# Altium PCB ArmBand-Control-Board.PcbDoc (part 2 of 3)
Units mil, origin at the board's own origin, x right, y up, seen from the top; angles counter-clockwise.
Board outline 1771.65 x 1771.65 mil, 2 copper layers (Top Layer, Bottom Layer), stack 34 mil thick; 107 components, 81 nets, 408 pads, 170 vias.
Unrouted connection lines stored in the file: 5.
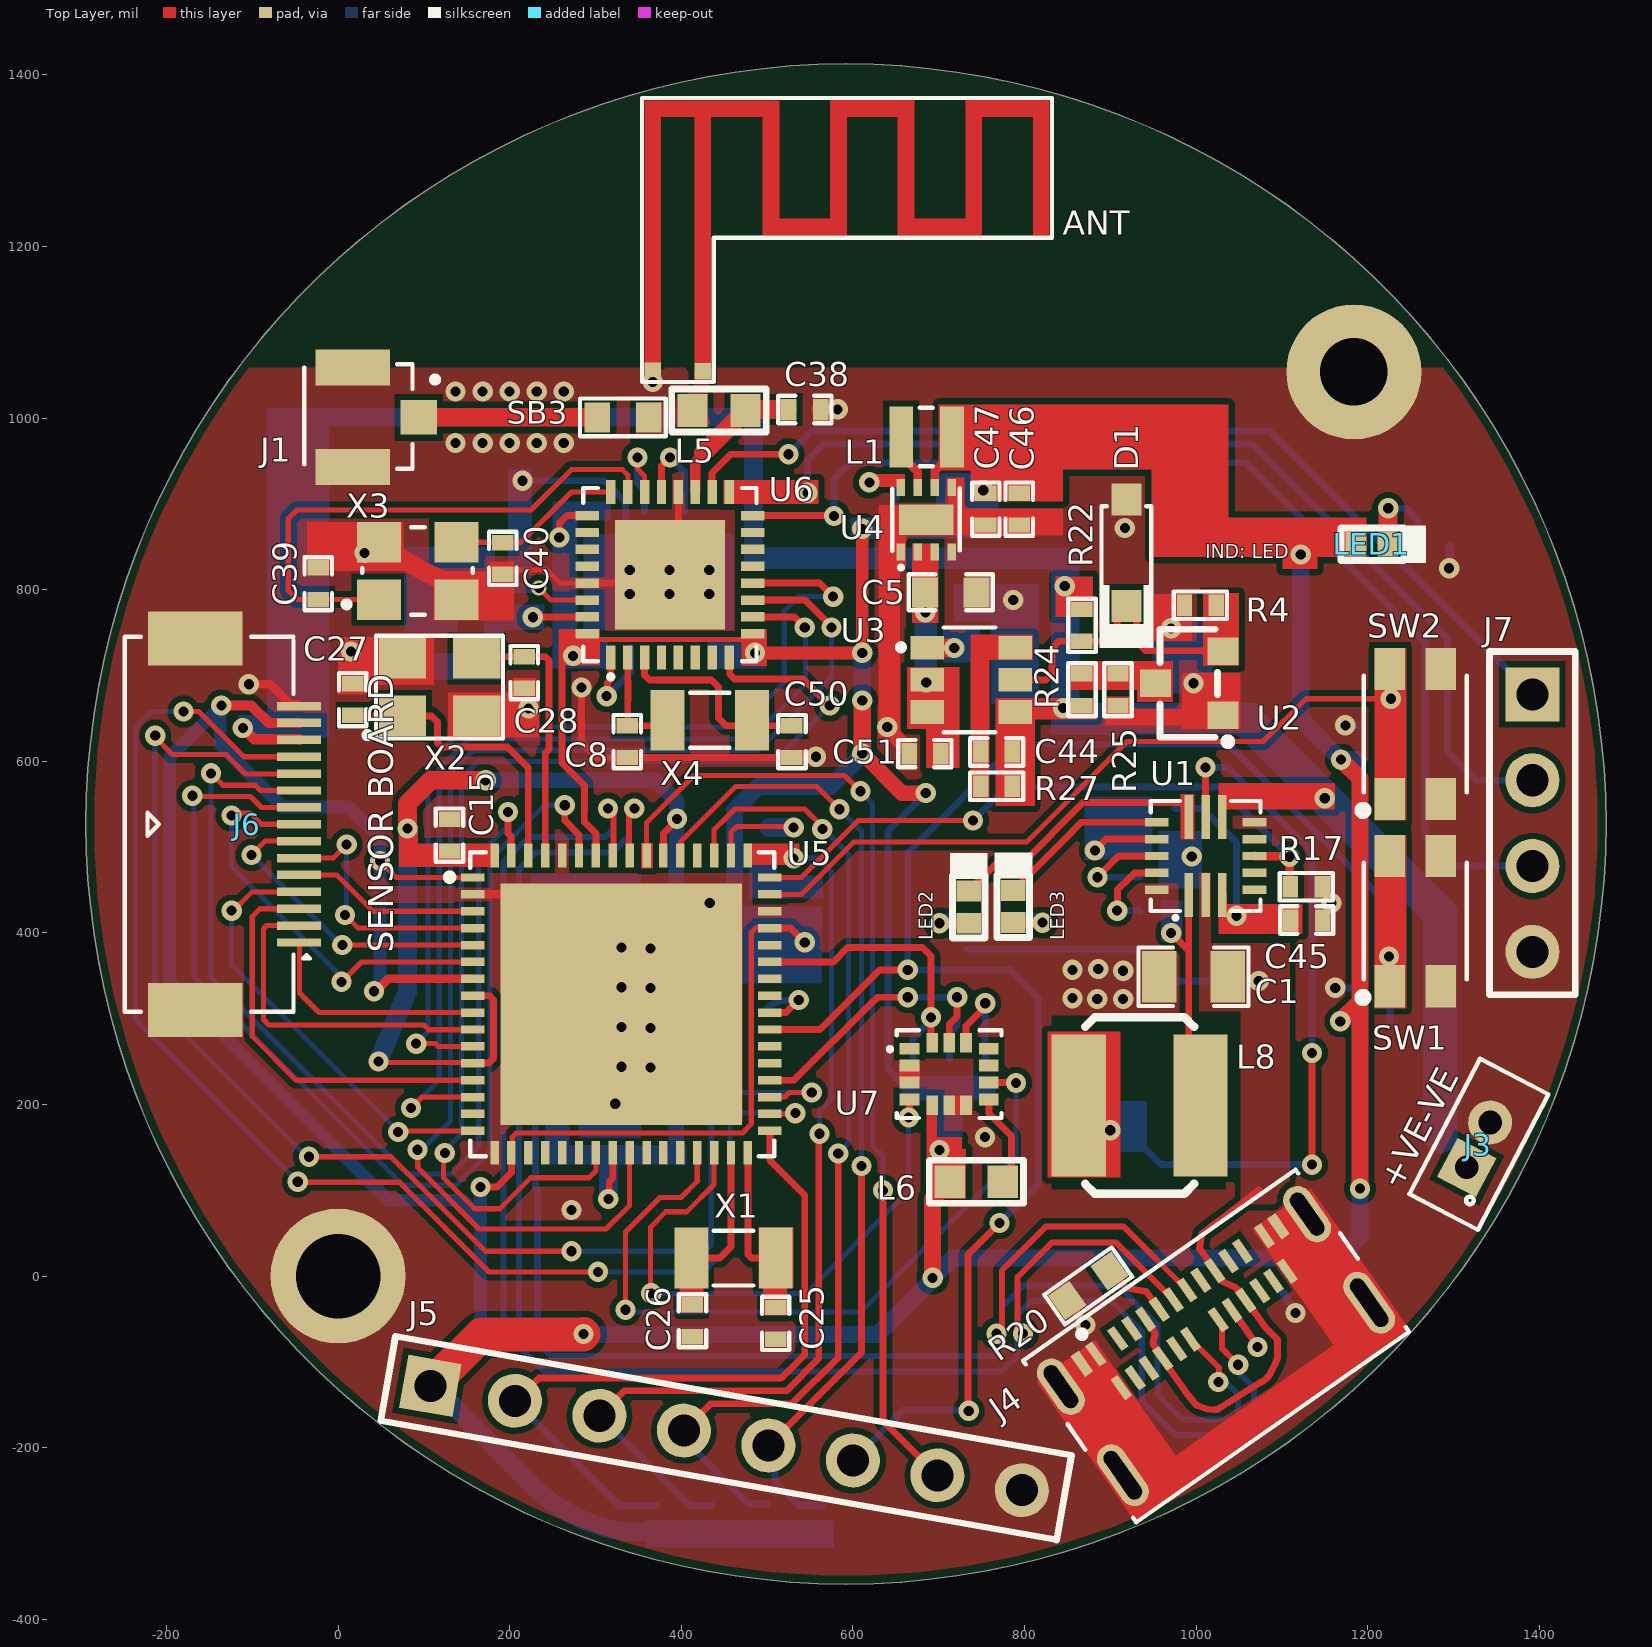
[diagram p0: Top Layer view]

## Part data (continued)
R2 R3 R9 R28: library part RC0402JR-071KL, "RES 1K OHM 5% 1/16W 0402", Case Code (Imperial)=0402, Case Code (Metric)=1005, Manufacturer=Yageo, Max Operating Temperature=155°C, Max Power Dissipation=63mW, Min Operating Temperature=-55°C, Package Quantity=1, Power Rating=62.5mW, Resistance=1kR, Resistance Tolerance=5%, Resistor Type="Thick Film", Supplier Part Number 1=311-1.0KJRCT-ND, Temperature Coefficient=100ppm/°C, Voltage Rating=50V, Case/Package=0402, Category="Chip SMD Resistors", ComponentLink1Description=https://datasheet.ciiva.com/7983/1018594-7983558.pdf?src-supplier=Element14, ComponentLink1URL=https://datasheet.ciiva.com/7983/1018594-7983558.pdf?src-supplier=Element14, ComponentLink2Description=https://datasheet.ciiva.com/2452/pyu-r-int-thick-7-2452756.pdf?src-supplier=Digi-Key, ComponentLink2URL=https://datasheet.ciiva.com/2452/pyu-r-int-thick-7-2452756.pdf?src-supplier=Digi-Key, ComponentLink3Description=https://datasheet.ciiva.com/2452/pyu-r-int-thick-7-2452757.pdf?src-supplier=Digi-Key, ComponentLink3URL=https://datasheet.ciiva.com/2452/pyu-r-int-thick-7-2452757.pdf?src-supplier=Digi-Key, ComponentLink4Description=https://datasheet.ciiva.com/2452/pyu-r-int-thick-7-2452755.pdf?src-supplier=Digi-Key, ComponentLink4URL=https://datasheet.ciiva.com/2452/pyu-r-int-thick-7-2452755.pdf?src-supplier=Digi-Key, ComponentLink5Description=https://datasheet.ciiva.com/7850/1018594-7850170.pdf?src-supplier=Element14, ComponentLink5URL=https://datasheet.ciiva.com/7850/1018594-7850170.pdf?src-supplier=Element14, ComponentLink6Description=https://datasheet.ciiva.com/7850/1018594-7850171.pdf?src-supplier=Element14, ComponentLink6URL=https://datasheet.ciiva.com/7850/1018594-7850171.pdf?src-supplier=Element14, ComponentLink7Description=https://datasheet.ciiva.com/17081/pyu-rc0402-51-rohs-l-6-r-17081438.pdf?src-supplier=Future+Electronics, ComponentLink7URL=https://datasheet.ciiva.com/17081/pyu-rc0402-51-rohs-l-6-r-17081438.pdf?src-supplier=Future+Electronics, Construction=Rectangular, Depth=0.5mm, Features="Moisture Resistant", Height=0.016inch, Lead Free="Lead Free", Length=0.039inch, Manufacturer Part Number=RC0402JR-071KL, Military Standard=Not, Number of Terminations=2, Packaging="Tape and Reel", Pricing 1="1=0.10000, 10=0.01300, 100=0.00540, 1000=0.00244, 2500=0.00212, 5000=0.00175 (USD)", REACH SVHC="No SVHC", RoHS=Yes, RoHS Compliant=Yes, Series=RC, Size Code=0402, Stock 1=452315, Supplier 1=Digi-Key, Termination=SMD/SMT, Tolerance=5%, Width=0.02inch
R4 R5 R6 R12 R18 R19 R25 R27: library part RC0402FR-0710KL, "RES SMD 10K OHM 1% 1/16W 0402", Case Code (Imperial)=0402, Case Code (Metric)=1005, Manufacturer=Yageo, Max Operating Temperature=155°C, Min Operating Temperature=-55°C, Power Rating=62.5mW, Resistance=10kR, Supplier Part Number 1=311-10.0KLRDKR-ND, Temperature Coefficient=100ppm/°C, Tolerance=1%, Voltage Rating=50V, Case/Package=0402, ComponentLink1Description=http://www.farnell.com/datasheets/2167052.pdf?src-supplier=Element14, ComponentLink1URL=http://www.farnell.com/datasheets/2167052.pdf?src-supplier=Element14, ComponentLink2Description=http://www.farnell.com/datasheets/1686128.pdf?src-supplier=Element14, ComponentLink2URL=http://www.farnell.com/datasheets/1686128.pdf?src-supplier=Element14, ComponentLink3Description=http://www.farnell.com/datasheets/1784430.pdf?src-supplier=Element14, ComponentLink3URL=http://www.farnell.com/datasheets/1784430.pdf?src-supplier=Element14, ComponentLink4Description=http://www.yageo.com/documents/recent/PYu-RC_Group_51_RoHS_L_9.pdf?src-supplier=Mouser, ComponentLink4URL=http://www.yageo.com/documents/recent/PYu-RC_Group_51_RoHS_L_9.pdf?src-supplier=Mouser, Composition="Thick Film", Depth=0.5mm, Height=0.32mm, Lead Free="Lead Free", Lead Pitch=0.2mm, Length=1mm, Manufacturer Part Number=RC0402FR-0710KL, Military Standard=Not, Number of Pins=2, Number of Terminations=2, Packaging="Tape and Reel", Pricing 1="1=0.1, 10=0.016, 100=0.0064, 1000=0.00289, 2500=0.00251, 5000=0.00207 (USD)", REACH SVHC="No SVHC", Stock 1=60122563, Supplier 1=Digi-Key, Termination=SMD/SMT, Voltage Rating (DC)=50V, Width=0.5mm, Working Voltage=50V
R7 R8 R13 R14 R15 R16 R17 R26: library part ERJPA2F1003X, "RES SMD 100K OHM 1% 1/5W 0402", Case Code (Imperial)=0402, Case Code (Metric)=1005, Manufacturer=Panasonic, Manufacturer Part Number=ERJ-PA2F1003X, Max Operating Temperature=155°C, Max Power Dissipation=200mW, Min Operating Temperature=-55°C, Resistance=100kR, Supplier Part Number 1=P17236CT-ND, Temperature Coefficient=100ppm/°C, Tolerance=1%, Voltage Rating=50V, Case/Package=0402, ComponentLink1Description=http://www.farnell.com/datasheets/2051174.pdf?src-supplier=Element14, ComponentLink1URL=http://www.farnell.com/datasheets/2051174.pdf?src-supplier=Element14, ComponentLink2Description=https://industrial.panasonic.com/ww/system/files/data/download/catalog/id_fixed-resistors_e_1.pdf?src-supplier=Digi-Key, ComponentLink2URL=https://industrial.panasonic.com/ww/system/files/data/download/catalog/id_fixed-resistors_e_1.pdf?src-supplier=Digi-Key, Composition="Thick Film", Features="Automotive AEC-Q200", Height=0.016inch, Length=0.039inch, Number of Terminations=2, Packaging="Cut Tape", Power Rating=200mW, Pricing 1="1=0.21, 10=0.175, 100=0.0686, 1000=0.02871, 2500=0.02632, 5000=0.02393 (USD)", REACH SVHC=Unknown, Stock 1=8829, Supplier 1=Digi-Key, Voltage Rating (DC)=50V, Width=0.02inch
R10 R11: library part ERJ2GEJ472X, "RES SMD 4.7K OHM 5% 1/10W 0402", Case Code (Imperial)=0402, Case Code (Metric)=1005, Manufacturer=Panasonic, Manufacturer Part Number=ERJ-2GEJ472X, Max Operating Temperature=155°C, Max Power Dissipation=100mW, Min Operating Temperature=-55°C, Package Quantity=1, Resistance=4.7kR, Resistance Tolerance=5%, Resistor Type="Thick Film", Temperature Coefficient=200ppm/°C, Voltage Rating=50V, Case/Package=0402, Category="Chip SMD Resistors", ComponentLink1Description=https://datasheet.ciiva.com/11821/0900766b80f806dd-11821328.pdf?src-supplier=RSComponents, ComponentLink1URL=https://datasheet.ciiva.com/11821/0900766b80f806dd-11821328.pdf?src-supplier=RSComponents, ComponentLink2Description=https://datasheet.ciiva.com/46377/1678796-46377565.pdf?src-supplier=Element14, ComponentLink2URL=https://datasheet.ciiva.com/46377/1678796-46377565.pdf?src-supplier=Element14, ComponentLink3Description=https://datasheet.ciiva.com/28514/1678796-28514168.pdf?src-supplier=Element14, ComponentLink3URL=https://datasheet.ciiva.com/28514/1678796-28514168.pdf?src-supplier=Element14, ComponentLink4Description=https://datasheet.ciiva.com/16758/70260739-16758341.pdf?src-supplier=Allied+Electronics, ComponentLink4URL=https://datasheet.ciiva.com/16758/70260739-16758341.pdf?src-supplier=Allied+Electronics, ComponentLink5Description=https://datasheet.ciiva.com/16770/70260739-16770309.pdf?src-supplier=Allied+Electronics, ComponentLink5URL=https://datasheet.ciiva.com/16770/70260739-16770309.pdf?src-supplier=Allied+Electronics, Construction=Rectangular, Contact Plating=Tin, Depth=0.5mm, Features="Automotive AEC-Q200", Height=0.35mm, Lead Free="Lead Free", Length=1mm, Military Standard=Not, Mount="Surface Mount", Number of Terminations=2, Packaging="Cut Tape", Power Rating=100mW, Pricing 1="10000=0.00340 (USD)", Radiation Hardening=No, REACH SVHC="No SVHC", RoHS=Yes, RoHS Compliant=Yes, Series=ERJ, Size Code=0402, Stock 1=1650000, Supplier 1="Arrow Electronics", Supplier Part Number 1=ERJ-2GEJ472X, Technology="THICK FILM", Termination=SMD/SMT, Tolerance=5%, Voltage Rating (DC)=50V, Width=0.5mm
R20 R21: library part RMCF0603FT5K10, "RES 5.1K OHM 1% 1/10W 0603", Case Code (Imperial)=0603, Case Code (Metric)=1608, Manufacturer="Stackpole Electronics", Max Operating Temperature=155°C, Max Power Dissipation=100mW, Min Operating Temperature=-55°C, Resistance=5.1kR, Resistor Type="Thick Film", Supplier Part Number 1=RMCF0603FT5K10DKR-ND, Temperature Coefficient=100ppm/°C, Tolerance=1%, Case/Package=0603, ComponentLink1Description=https://www.seielect.com/catalog/SEI-RMCF_RMCP.pdf?src-supplier=Avnet, ComponentLink1URL=https://www.seielect.com/catalog/SEI-RMCF_RMCP.pdf?src-supplier=Avnet, ComponentLink2Description=http://components.arrow.com/part/dataview/50863347S9465827N1174?src-supplier=Arrow+Electronics, ComponentLink2URL=http://components.arrow.com/part/dataview/50863347S9465827N1174?src-supplier=Arrow+Electronics, ComponentLink3Description=https://www.seielect.com/catalog/SEI-Packaging.pdf?src-supplier=Digi-Key, ComponentLink3URL=https://www.seielect.com/catalog/SEI-Packaging.pdf?src-supplier=Digi-Key, Contact Plating=Tin,Matte, Features="Automotive AEC-Q200", Height=0.022inch, Length=0.061inch, Manufacturer Part Number=RMCF0603FT5K10, Mount="Surface Mount", Number of Terminations=2, Packaging="Tape and Reel", Pricing 1="1=0.1, 10=0.017, 100=0.0068, 1000=0.00305, 2500=0.00264 (USD)", Radiation Hardening=No, RoHS Compliant=Yes, Series=RMCF, Stock 1=58341, Supplier 1=Digi-Key, Width=0.031inch
R22: library part RC0402FR-0710KL, "RES 10K OHM 1% 1/16W 0402", Case Code (Imperial)=0402, Case Code (Metric)=1005, LCSC Part Number=C60490, Manufacturer=Yageo, Max Operating Temperature=155°C, Max Power Dissipation=63mW, Min Operating Temperature=-55°C, Power Rating=62.5mW, Resistance=10kR, Resistance Tolerance=1%, Resistor Type="Thick Film", Supplier Part Number 1=603-RC0402FR-0710KL, Temperature Coefficient=100ppm/°C, Voltage Rating=50V, Case/Package=0402, Category="Chip SMD Resistors", ComponentLink1Description=https://datasheet.ciiva.com/7660/38568-7660787.pdf?src-supplier=Element14, ComponentLink1URL=https://datasheet.ciiva.com/7660/38568-7660787.pdf?src-supplier=Element14, ComponentLink2Description=https://datasheet.ciiva.com/7849/1686128-7849814.pdf?src-supplier=Element14, ComponentLink2URL=https://datasheet.ciiva.com/7849/1686128-7849814.pdf?src-supplier=Element14, ComponentLink3Description=https://datasheet.ciiva.com/7983/1018594-7983486.pdf?src-supplier=Element14, ComponentLink3URL=https://datasheet.ciiva.com/7983/1018594-7983486.pdf?src-supplier=Element14, ComponentLink4Description=https://datasheet.ciiva.com/22747/1018594-22747512.pdf?src-supplier=Element14, ComponentLink4URL=https://datasheet.ciiva.com/22747/1018594-22747512.pdf?src-supplier=Element14, ComponentLink5Description=https://datasheet.ciiva.com/12667/pyu-rc0402-51-rohs-l-6-r-12667067.pdf?src-supplier=Mouser, ComponentLink5URL=https://datasheet.ciiva.com/12667/pyu-rc0402-51-rohs-l-6-r-12667067.pdf?src-supplier=Mouser, ComponentLink6Description=https://datasheet.ciiva.com/7849/1784430-7849813.pdf?src-supplier=Element14, ComponentLink6URL=https://datasheet.ciiva.com/7849/1784430-7849813.pdf?src-supplier=Element14, ComponentLink7Description=https://datasheet.ciiva.com/7849/1784430-7849815.pdf?src-supplier=Element14, ComponentLink7URL=https://datasheet.ciiva.com/7849/1784430-7849815.pdf?src-supplier=Element14, Construction=Rectangular, Depth=0.5mm, Features="Moisture Resistant", Height=0.32mm, Item Type=Resistor, Lead Free="Lead Free", Lead Pitch=0.2mm, Length=1mm, Manufacturer Part Number=RC0402FR-0710KL, Military Standard=Not, Number of Pins=2, Number of Terminations=2, Packaging="Tape and Reel", Pricing 1="1=0.10000, 10=0.01400, 50=0.01400, 100=0.00500, 1000=0.00300, 10000=0.00200 (USD)", REACH SVHC="No SVHC", RoHS=Yes, RoHS Compliant=Yes, Series=RC, Stock 1=18648329, Supplier 1=Mouser, Termination=SMD/SMT, Tolerance=1%, Voltage Rating (DC)=50V, Width=0.5mm, Working Voltage=50V
R24: library part AC0402DR-0710K7L, "RES SMD 0402 10.7kOhm 0.5% Paper T/R", Manufacturer=Yageo, Category="Chip SMD Resistors", Manufacturer Part Number=AC0402DR-0710K7L, Pricing 1="10000=0.00820 (USD)", RoHS=Yes, RoHS Compliant=Yes, Supplier 1=Avnet, Supplier Part Number 1=AC0402DR-0710K7L
SB1 SB2 SB3: "Solder Bridge ON"
SW1 SW2: "3mm 2mm Round Button 50mA Top3.65mm SPST 12V SMD Tactile Switches", Manufacturer=XKB, ComponentLink1Description=LCSC, ComponentLink1URL=https://lcsc.com/product-detail/Tactile-Switches_XKB-Connectivity-TS-1185EC-C-D-B_C318893.html, Manufacturer Part Number=TS-1185EC-C-D-B
U1: "2.1A, 1- OR 2-CELL LI-ION BATTER", Manufacturer="Monolithic Power Systems", Supplier Part Number 1=1589-MP2615CGQ-ZCT-ND, Category=Uncategorized, Manufacturer Part Number=MP2615CGQ-Z, Pricing 1="1=2.38000, 10=2.13500, 25=2.01400, 100=1.71590, 250=1.61120, 500=1.40980, 1000=1.16812, 2500=1.14000 (USD)", RoHS=No, Stock 1=5000, Supplier 1=Digi-Key
U2: library part MAX809SEUR+T, "IC MPU/RESET CIRC SOT23-3", Case/Package=SOT-23, Manufacturer=Maxim, Max Operating Temperature=105°C, Max Output Current=20mA, Max Power Dissipation=320mW, Max Reset Threshold Voltage=2.96V, Max Supply Voltage=5.5V, Min Operating Temperature=-40°C, Min Reset Threshold Voltage=2.89V, Min Supply Voltage=1.2V, Nominal Supply Current=17uA, Number of Voltages Monitored=1, Operating Supply Current=60uA, Supplier Part Number 1=700-MAX809SEURT, Threshold Voltage=2.93V, Category="Voltage Supervisors", ComponentLink1Description=https://datasheet.ciiva.com/1169/max803-max810z-1169879.pdf?src-supplier=Element14, ComponentLink1URL=https://datasheet.ciiva.com/1169/max803-max810z-1169879.pdf?src-supplier=Element14, ComponentLink2Description=https://datasheet.ciiva.com/1169/max803-max810z-1169878.pdf?src-supplier=Element14, ComponentLink2URL=https://datasheet.ciiva.com/1169/max803-max810z-1169878.pdf?src-supplier=Element14, ComponentLink3Description=https://datasheet.ciiva.com/14226/max803-max810z-14226330.pdf?src-supplier=Avnet, ComponentLink3URL=https://datasheet.ciiva.com/14226/max803-max810z-14226330.pdf?src-supplier=Avnet, ComponentLink4Description=https://datasheet.ciiva.com/1973/max803-max810z-1973322.pdf?src-supplier=Digi-Key, ComponentLink4URL=https://datasheet.ciiva.com/1973/max803-max810z-1973322.pdf?src-supplier=Digi-Key, ComponentLink5Description=https://datasheet.ciiva.com/1973/max803-max810z-1973323.pdf?src-supplier=Digi-Key, ComponentLink5URL=https://datasheet.ciiva.com/1973/max803-max810z-1973323.pdf?src-supplier=Digi-Key, ComponentLink6Description=https://datasheet.ciiva.com/1973/max803-max810z-1973321.pdf?src-supplier=Digi-Key, ComponentLink6URL=https://datasheet.ciiva.com/1973/max803-max810z-1973321.pdf?src-supplier=Digi-Key, Height=0.94mm, Lead Free="Lead Free", Length=2.92mm, Manufacturer Part Number=MAX809SEUR+T, Mount="Surface Mount", Number of Pins=3, Output=TOTEM-POLE, Output Type=PUSH-PULL, Overvoltage Threshold=2.96V, Package Quantity=1, Packaging="Cut Tape", Power Dissipation=320mW, Pricing 1="1=3.68000, 10=3.31000, 25=3.13000, 50=3.13000, 100=2.72000, 250=2.58000, 500=2.31000, 1000=2.09000, 10000=2.01000 (USD)", Radiation Hardening=No, REACH SVHC="No SVHC", Reset="Active Low", Reset Timeout=140ms, RoHS=Yes, RoHS Compliant=Yes, Series=-, Stock 1=26180, Supplier 1=Mouser, Termination=SMD/SMT, Type="Simple Reset/Power-On Reset", Undervoltage Threshold=2.89V, Watchdog Timer=No, Width=1.3mm
U3: "IC PWR SWITCH P-CH 1:1 SUPERSOT6", Case/Package=SOT-23-6, Continuous Drain Current (ID)=2.3A, Drain to Source Voltage (Vdss)=20V, Manufacturer="ON Semiconductor / Fairchild", Max Operating Temperature=150°C, Max Power Dissipation=700mW, Min Input Voltage=3V, Min Operating Temperature=-55°C, On-State Resistance=80mR, Output Current=1.6A, Package Quantity=3000, Supplier Part Number 1=58K8823, Category="Hot Swap Controllers", ComponentLink1Description=https://datasheet.ciiva.com/34302/1222713-34302120.pdf?src-supplier=Jameco, ComponentLink1URL=https://datasheet.ciiva.com/34302/1222713-34302120.pdf?src-supplier=Jameco, ComponentLink2Description=https://datasheet.ciiva.com/4898/fdc6330l-102811-4898611.pdf?src-supplier=Mouser, ComponentLink2URL=https://datasheet.ciiva.com/4898/fdc6330l-102811-4898611.pdf?src-supplier=Mouser, ComponentLink3Description=https://datasheet.ciiva.com/1171/fdc6330l-1171185.pdf?src-supplier=Newark, ComponentLink3URL=https://datasheet.ciiva.com/1171/fdc6330l-1171185.pdf?src-supplier=Newark, ComponentLink4Description=https://datasheet.ciiva.com/1572/276121-1572006.pdf?src-supplier=Farnell, ComponentLink4URL=https://datasheet.ciiva.com/1572/276121-1572006.pdf?src-supplier=Farnell, ComponentLink5Description=https://datasheet.ciiva.com/28483/276121-28483263.pdf?src-supplier=Element14, ComponentLink5URL=https://datasheet.ciiva.com/28483/276121-28483263.pdf?src-supplier=Element14, ComponentLink6Description=https://datasheet.ciiva.com/1512/276121-1512459.pdf?src-supplier=Element14, ComponentLink6URL=https://datasheet.ciiva.com/1512/276121-1512459.pdf?src-supplier=Element14, ComponentLink7Description=https://datasheet.ciiva.com/3232/fdc6330l-3232841.pdf?src-supplier=Avnet, ComponentLink7URL=https://datasheet.ciiva.com/3232/fdc6330l-3232841.pdf?src-supplier=Avnet, ComponentLink8Description=https://datasheet.ciiva.com/17090/fdc6330l-17090428.pdf?src-supplier=Future+Electronics, ComponentLink8URL=https://datasheet.ciiva.com/17090/fdc6330l-17090428.pdf?src-supplier=Future+Electronics, ComponentLink9Description=https://datasheet.ciiva.com/3232/fdc6330l-3232552.pdf?src-supplier=Avnet, ComponentLink9URL=https://datasheet.ciiva.com/3232/fdc6330l-3232552.pdf?src-supplier=Avnet, ComponentLink10Description=https://datasheet.ciiva.com/1962/fdc6330l-1962053.pdf?src-supplier=Digi-Key, ComponentLink10URL=https://datasheet.ciiva.com/1962/fdc6330l-1962053.pdf?src-supplier=Digi-Key, ComponentLink11Description=https://datasheet.ciiva.com/1962/fdc6330l-1962054.pdf?src-supplier=Digi-Key, ComponentLink11URL=https://datasheet.ciiva.com/1962/fdc6330l-1962054.pdf?src-supplier=Digi-Key, ComponentLink12Description=https://datasheet.ciiva.com/1962/fdc6330l-1962052.pdf?src-supplier=Digi-Key, ComponentLink12URL=https://datasheet.ciiva.com/1962/fdc6330l-1962052.pdf?src-supplier=Digi-Key, Current=2.3A, Current Rating=2.3A, Height=1mm, Interface=On/Off, Lead Free="Lead Free", Length=3mm, Manufacturer Part Number=FDC6330L, Max Input Voltage=20V, Max Output Current=2.3A, Max Supply Voltage=20V, Min Supply Voltage=3V, Mount="Surface Mount", Number of Outputs=1, Number of Pins=6, Operating Supply Voltage=20V, Output Configuration="High Side", Packaging="Tape and Reel", Power Dissipation=700mW, Power Rating=700mW, Pricing 1="1=0.70000, 25=0.57700, 50=0.52400, 100=0.47100, 250=0.43700, 500=0.37200, 1000=0.30700 (USD)", Radiation Hardening=No, REACH SVHC="No SVHC", RoHS=Yes, RoHS Compliant=Yes, Supplier 1=Newark, Voltage=20V, Voltage Rating (DC)=20V, Weight=0.036g, Width=1.7mm
U4: "Buck Switching Regulator IC Positive Fixed 3.3V 1 Output 1A 8-WFDFN Exposed Pad", Case/Package=SOIC, Manufacturer="Texas Instruments", Max Input Voltage=17V, Max Operating Temperature=125°C, Max Output Current=1A, Max Output Voltage=3.3V, Min Input Voltage=3V, Min Operating Temperature=-40°C, Package Quantity=3000, Quiescent Current=17uA, Supplier Part Number 1=595-TPS62162DSGR, Switching Frequency=2.25MHz, Category="Voltage Regulators - Switching", ComponentLink1Description=https://datasheet.ciiva.com/2034/tps62161-2034675.pdf?src-supplier=Digi-Key, ComponentLink1URL=https://datasheet.ciiva.com/2034/tps62161-2034675.pdf?src-supplier=Digi-Key, Contact Plating=Gold, Lead Free="Lead Free", Manufacturer Part Number=TPS62162DSGR, Min Output Voltage=3.3V, Number of Outputs=1, Number of Pins=8, Operating Supply Voltage=17V, Output Configuration=Positive, Output Current=1A, Output Type=Fixed, Output Voltage=3.3V, Packaging="Tape and Reel", Pricing 1="1=1.59000, 10=1.44000, 25=1.36000, 50=1.36000, 100=1.16000, 250=1.09000, 500=0.94700, 1000=0.78500, 10000=0.78400 (USD)", Radiation Hardening=No, RoHS=Yes, RoHS Compliant=Yes, Series=DCS-Control™, Supplier 1=Mouser, Synchronous Rectifier=Yes
U5: "IC MCU 32BIT 512KB FLASH 64QFN", Case/Package=QFN, Frequency=120MHz, Manufacturer=Microchip, Max Operating Temperature=85°C, Min Operating Temperature=-40°C, Supplier Part Number 1=ATSAM4S8BA-MU-ND, Category=Microcontrollers, ComponentLink1Description=http://www.microchip.com/mymicrochip/filehandler.aspx?ddocname=en590343&src-supplier=Digi-Key, ComponentLink1URL=http://www.microchip.com/mymicrochip/filehandler.aspx?ddocname=en590343&src-supplier=Digi-Key, Core Architecture=ARM, Interface=I2C,SPI,USB,IrDA,UART,USART, Manufacturer Part Number=ATSAM4S8BA-MU, Memory Size=512KB, Memory Type=FLASH, Number of I/Os=47, Oscillator Type=Internal, Packaging=Tray, Peripherals="Brown-out Detect/Reset,POR,PWM,WDT,DMA", Pricing 1="1=6.23000, 25=5.66960, 100=5.13000 (USD)", RoHS=Yes, RoHS Compliant=Yes, Supplier 1=Digi-Key
U6: "IC RF TXRX+MCU BLUETOOTH 32WFQFN", Manufacturer="Nordic Semiconductor", Supplier Part Number 1=1490-NRF52810-QCAA-RCT-ND, Category="RF Receivers, Transceivers", Manufacturer Part Number=NRF52810-QCAA-R, Pricing 1="1=3.54000, 10=3.16200, 25=2.84640, 100=2.59320, 250=2.34024, 500=2.09990, 1000=1.77100 (USD)", RoHS=Yes, RoHS Compliant=Yes, Stock 1=2906, Supplier 1=Digi-Key
U7: "iNEMO Inertial Module: 3D Accelerometer and 3D Gyroscope, 1.71V to 3.6V, -40°C to 85°C, VFLGA-14L, RoHS", Manufacturer=STMicroelectronics, Supplier Part Number 1=03AH2347, Category="Inertial Measurement Units (IMUs)", ComponentLink1Description=https://www.st.com/resource/en/datasheet/lsm6dsr.pdf?src-supplier=Digi-Key, ComponentLink1URL=https://www.st.com/resource/en/datasheet/lsm6dsr.pdf?src-supplier=Digi-Key, Manufacturer Part Number=LSM6DSRTR, RoHS=Yes, RoHS Compliant=Yes, Supplier 1=Newark
X1 X4: library part X321532768KGD2SI, "32.768kHz SMD Crystal Resonator 12.5pF ±20ppm -40℃~+85℃ SMD3215-2P Crystals ROHS", Manufacturer="Yangxing Tech", ComponentLink1Description=LCSC, ComponentLink1URL=https://www.lcsc.com/product-detail/Crystals_Yangxing-Tech-X321532768KGD2SI_C620155.html, Manufacturer Part Number=X321532768KGD2SI
X2: library part X322516MOB4SI, "16MHz SMD Crystal Resonator 12pF ±10ppm ±30ppm -40℃~+85℃ SMD3225-4P Crystals ROHS", Manufacturer="Yangxing Tech", ComponentLink1Description=LCSC, ComponentLink1URL=https://www.lcsc.com/product-detail/Crystals_Yangxing-Tech-X322516MOB4SI_C12668.html, Manufacturer Part Number=X322516MOB4SI
X3: library part XC32M4-32.000-F12NLDT, "32MHz SMD Crystal Resonator 12pF 40Ω ±10ppm ±20ppm -40℃~+85℃ SMD3225-4P Crystals ROHS", Manufacturer=HCI, Manufacturer Part Number=XC32M4-32.000-F12NLDT

## Free pads (board coordinates)
  round 157.48 hole 98.43: MH1(0,0)
  round 157.48 hole 78.74: MH2(1184,1054)

## Via types
v1: diameter 23.62, hole 11.81, Top Layer to Bottom Layer, tented both sides, 169 vias
v2: diameter 17.72, hole 11.81, Top Layer to Bottom Layer, tented both sides, 1 vias

## Nets (pads, with @x,y where several pads share a name; then routed paths per layer and width w, separated by ;. In a path a pad name is that pad's centre, name@x,y a point inside that pad or via, vN(x,y) a via of type N, cw(c..) or ccw(c..) an arc to the next point about the centre after c; other vN are vias at no path point)
\A\C\O\K\: LED3.2 U1.12 | length 200
  Top Layer w8: LED3.2@787,449.4 846.6,509 866.65,529.06 U1.12@954,529.06
\C\H\G\O\K\: LED2.2 U1.11 | length 314.3
  Top Layer w8: LED2.2@735,448.7 766.3,480 796.39,480 868.39,552 990,552 U1.11@990,535.5
ANT: C38.2 L5.2 U6.19 | length 173.9
  Top Layer w8: C38.2@518.5,1005 C38.2@523.5,1010
  Top Layer w12: U6.19@416.32,914 416.32,948.41 426,958.09 426,960
  Top Layer w20: L5.2@475,1009 L5.2@476.91,1009
  Top Layer w22: 426,960 439,973 ; 439.04,973 449,982.96 ; 449,983 L5.2@475,1009 ; L5.2@477.91,1010 C38.2@523.5,1010
ANT#: ANT.ANT# L5.1 SB3.1
AVDD: C32.1 L3.2 U6.30 | length 119.1
  Top Layer w6: v2(234,802) 247.99,788.01 U6.30@290.33,788.01
  Bottom Layer w12: 177,802 v2(234,802)
BATT_EN: R17.2 U1.6 U5.48 | length 760
  Top Layer w6: U5.48@503.23,464.64 539.95,464.64 606.31,531 669.09,531 v1(740,531)
  Top Layer w10: U1.6@1068.17,489.68 1068.25,489.61 1108.13,489.61 v1(1108.87,488.87) ; v1@1109.69,489.68 1109.39,489.39 1109.39,454.48 R17.2@1109.9,453.96
  Bottom Layer w8: v1(740,531) 779,570 889.44,570 953.56,570 1027.74,570 v1(1108.87,488.87)
BST: C22.1 L8.1 U1.1 | length 326
  Top Layer w8: v1(971,400) 991.4,379.6 ; U1.1@991.4,444.41 991.4,379.6 ; L8.1@1008,181 991.4,197.6 991.4,379.6
  Bottom Layer w8: v1(971,400) 971,420.5 C22.1@975.5,425
DEC1: C35.2 U6.1 | length 117.7
  Top Layer w8: v1@313,675 313.84,675.84 313.84,691.84 317.89,695.89 U6.1@317.89,721.08
  Bottom Layer w8: v1@313,675 313,675.33 341,703.33 C35.2@341,733
  other v1: 313,676
DEC2: C36.2 U6.21 | length 110.4
  Top Layer w8: U6.21@376.98,918.16 376.98,944.16 v1(387,954.19)
  Bottom Layer w8: v1(387,954.19) 404,937.19 C36.2@404,891
DEC3: C37.1 U6.22 | length 110.1
  Top Layer w6: v1(349,954.19) 349,941 357.26,932.74 U6.22@357.26,914
  Bottom Layer w8: v1(349,954.19) 349,924.45 357,916.45 C37.1@357,891
ERASE: J5.7 U5.55 | length 1154.4
  Top Layer w6: U5.55@359.53,490.23 360.45,491.15 359.53,492.07 359.53,528.37 367.12,535.97 414.78,583.62 590.38,583.62 608,566 v1(608.87,565.13)
  Top Layer w8: U5.55@359.53,492.07 U5.55@360.45,491.15 ; v1(635,100) 635,-168.65 J5.7@698.44,-232.09
  Bottom Layer w6: v1(608.87,565.13) 622.96,551.04 622.96,520.76 622.96,152.04 635,140 v1(635,100)
GND: ANT.GND C1.2 C2.2 C3.2 C4.2 C5.2 C6.2 C7.2 C8.1 C9.2 C10.2 C11.2 C12.2 C13.2 C14.2 C15.2 C16.1 C17.2 C18.2 C19.2 C20.2 C21.2 C23.2 C24.2 C25.1 C26.1 C27.1 C28.1 C31.2 C32.2 C33.2 C34.2 C35.1 C36.1 C37.2 C38.1 C39.1 C40.1 C41.2 C42.2 C43.2 C45.2 C46.2 C47.2 C50.1 C51.2 D1.1 J1.2 J1.3 J3.2 J4.A1 J4.A12 J4.B1 J4.B12 J4.G1 J4.G2 J4.S1 J4.S2 J4.S3 J4.S4 J5.8 J6.15 J6.MP1 J6.MP2 J7.4 pad.MH1 pad.MH2 R4.1 R9.2 R17.1 R19.2 R20.1 R21.1 R25.2 R28.1 SW1.2 SW2.2 U1.8 U1.16 U2.1 U4.1 U4.4 U4.5 U4.9 U5.2 U5.17 U5.46 U5.60 U5.65 U6.20 U6.29 U6.33 U7.2 U7.3 U7.6 U7.7 X2.2 X2.4 X3.2 X3.4 | length 1601.9
  Top Layer w6: X3.2@157.5,793 187.5,823 243.21,823 258.51,807.7 U6.29@290.33,807.7
  Top Layer w8: X3.4@46,862 X3.4@46,874.48 ; v1(283.81,686) 283.81,622.19 301.43,604.57 C8.1@337,604.57 ; U6.29@290.33,807.7 322.73,807.7 332.57,817.54 U6.33@386.79,817.54 ; C8.1@337,604.5 523.5,604.5 524.5,603.5 525.5,604.5 556.5,604.5 557,605 v1(557,605.43) ; v1(386.33,823) 386.33,818 U6.33@386.79,817.54 ; U6.33@386.79,823 386.79,871.76 396.63,881.59 U6.20@396.63,914 ; U6.33@396.63,827.38 389.29,820.04 U6.33@386.79,817.54
  Top Layer w10: v1(-104,689.81) -78.81,689.81 -55.36,666.36 -46.89,666.36 J6.15@-45,664.47 ; U5.2@156.77,444.95 202.05,444.95 U5.65@330,317 ; R20.1@849.85,-28.41 v1(871,-57)
  Top Layer w18: v1(640,640) 643,640 646,637 646,632 665.5,612.5 C51.2@665.5,609
  Top Layer w19.68: v1(366.8,1042.2) 366.8,1066.03
  Top Layer w22: X3.4@47.72,855.46 62.32,842.84 105.36,818.75 ccw(c112.69,831.84) 106.38,818.23 122,811 X3.2@138.28,788.54 ; C38.1@562.5,1010.25 v1(582.25,1010.25) ; 643,808 643,844 647,848
  Top Layer w40: pad.MH1@-20.16,22.48 pad.MH1@-0.8,3.12
  Bottom Layer w8: v1(215,927) 310.31,927 335,902.31 335,854 ; 377,812 377,813 ; v1(1162.19,336) C24.2@1189,336 ; v1(1174,642) C23.2@1190,642
  Bottom Layer w10: R21.1@1102.15,-20.59 v1(1116,-43) ; v1(1295,825) 1295.5,825.5 R28.1@1295.5,851
  other v1: 272,77 754,162 323,201 364,243 330.21,244.04 364,289.33 330.21,290.38 884.88,323 915,323 855.88,324 364,335.67 330.21,336.71 915,356 855.88,357 886,358 364,382 330.21,383.04 433.19,435 1157.81,435 995,489 222,661.81 997,691 15,728 971,755 787,788 340,795 386.33,795 432.67,795 340,823 432.67,823 31,843 917,872 137,971 168.5,971 200,971 231.5,971 263,971 137,1031 168.5,1031 200,1031 231.5,1031 263,1031
INT1: U5.30 U7.4 | length 665.9
  Top Layer w6: v1(365,-20) 364,-19 364,57 382,75 406.45,75 438.27,106.82 U5.30@438.27,143.77 ; v1(665,185) v1@666,186
  Top Layer w8: v1@666,186 U7.4@666,206
  Bottom Layer w6: v1(365,-20) 545.85,-20 665,99.15 v1(665,185)
INT2: U5.29 U7.9 | length 880.6
  Top Layer w6: v1(335,-39.19) 335,51.45 375.13,91.58 399.58,91.58 418.58,110.58 U5.29@418.58,143.77 ; v1@789.29,225.71 v1(790,225)
  Top Layer w8: U7.9@758.52,225.69 v1@789.29,225.71
  Bottom Layer w6: v1(335,-39.19) 337.62,-41.81 472.6,-41.81 609.19,-41.81 790,139 v1(790,225)